# Altium PCB 0.PCB1.PcbDoc (part 7 of 10)
Units mil, origin at the board's own origin, x right, y up, seen from the top; angles counter-clockwise.
Board outline 3897.64 x 3897.64 mil, 6 copper layers (Top Layer, Layer 1, Layer 3, Layer 4, Layer 2, Bottom Layer), stack 60.567 mil thick; 715 components, 563 nets, 2530 pads, 1442 vias.
Unrouted connection lines stored in the file: 6.
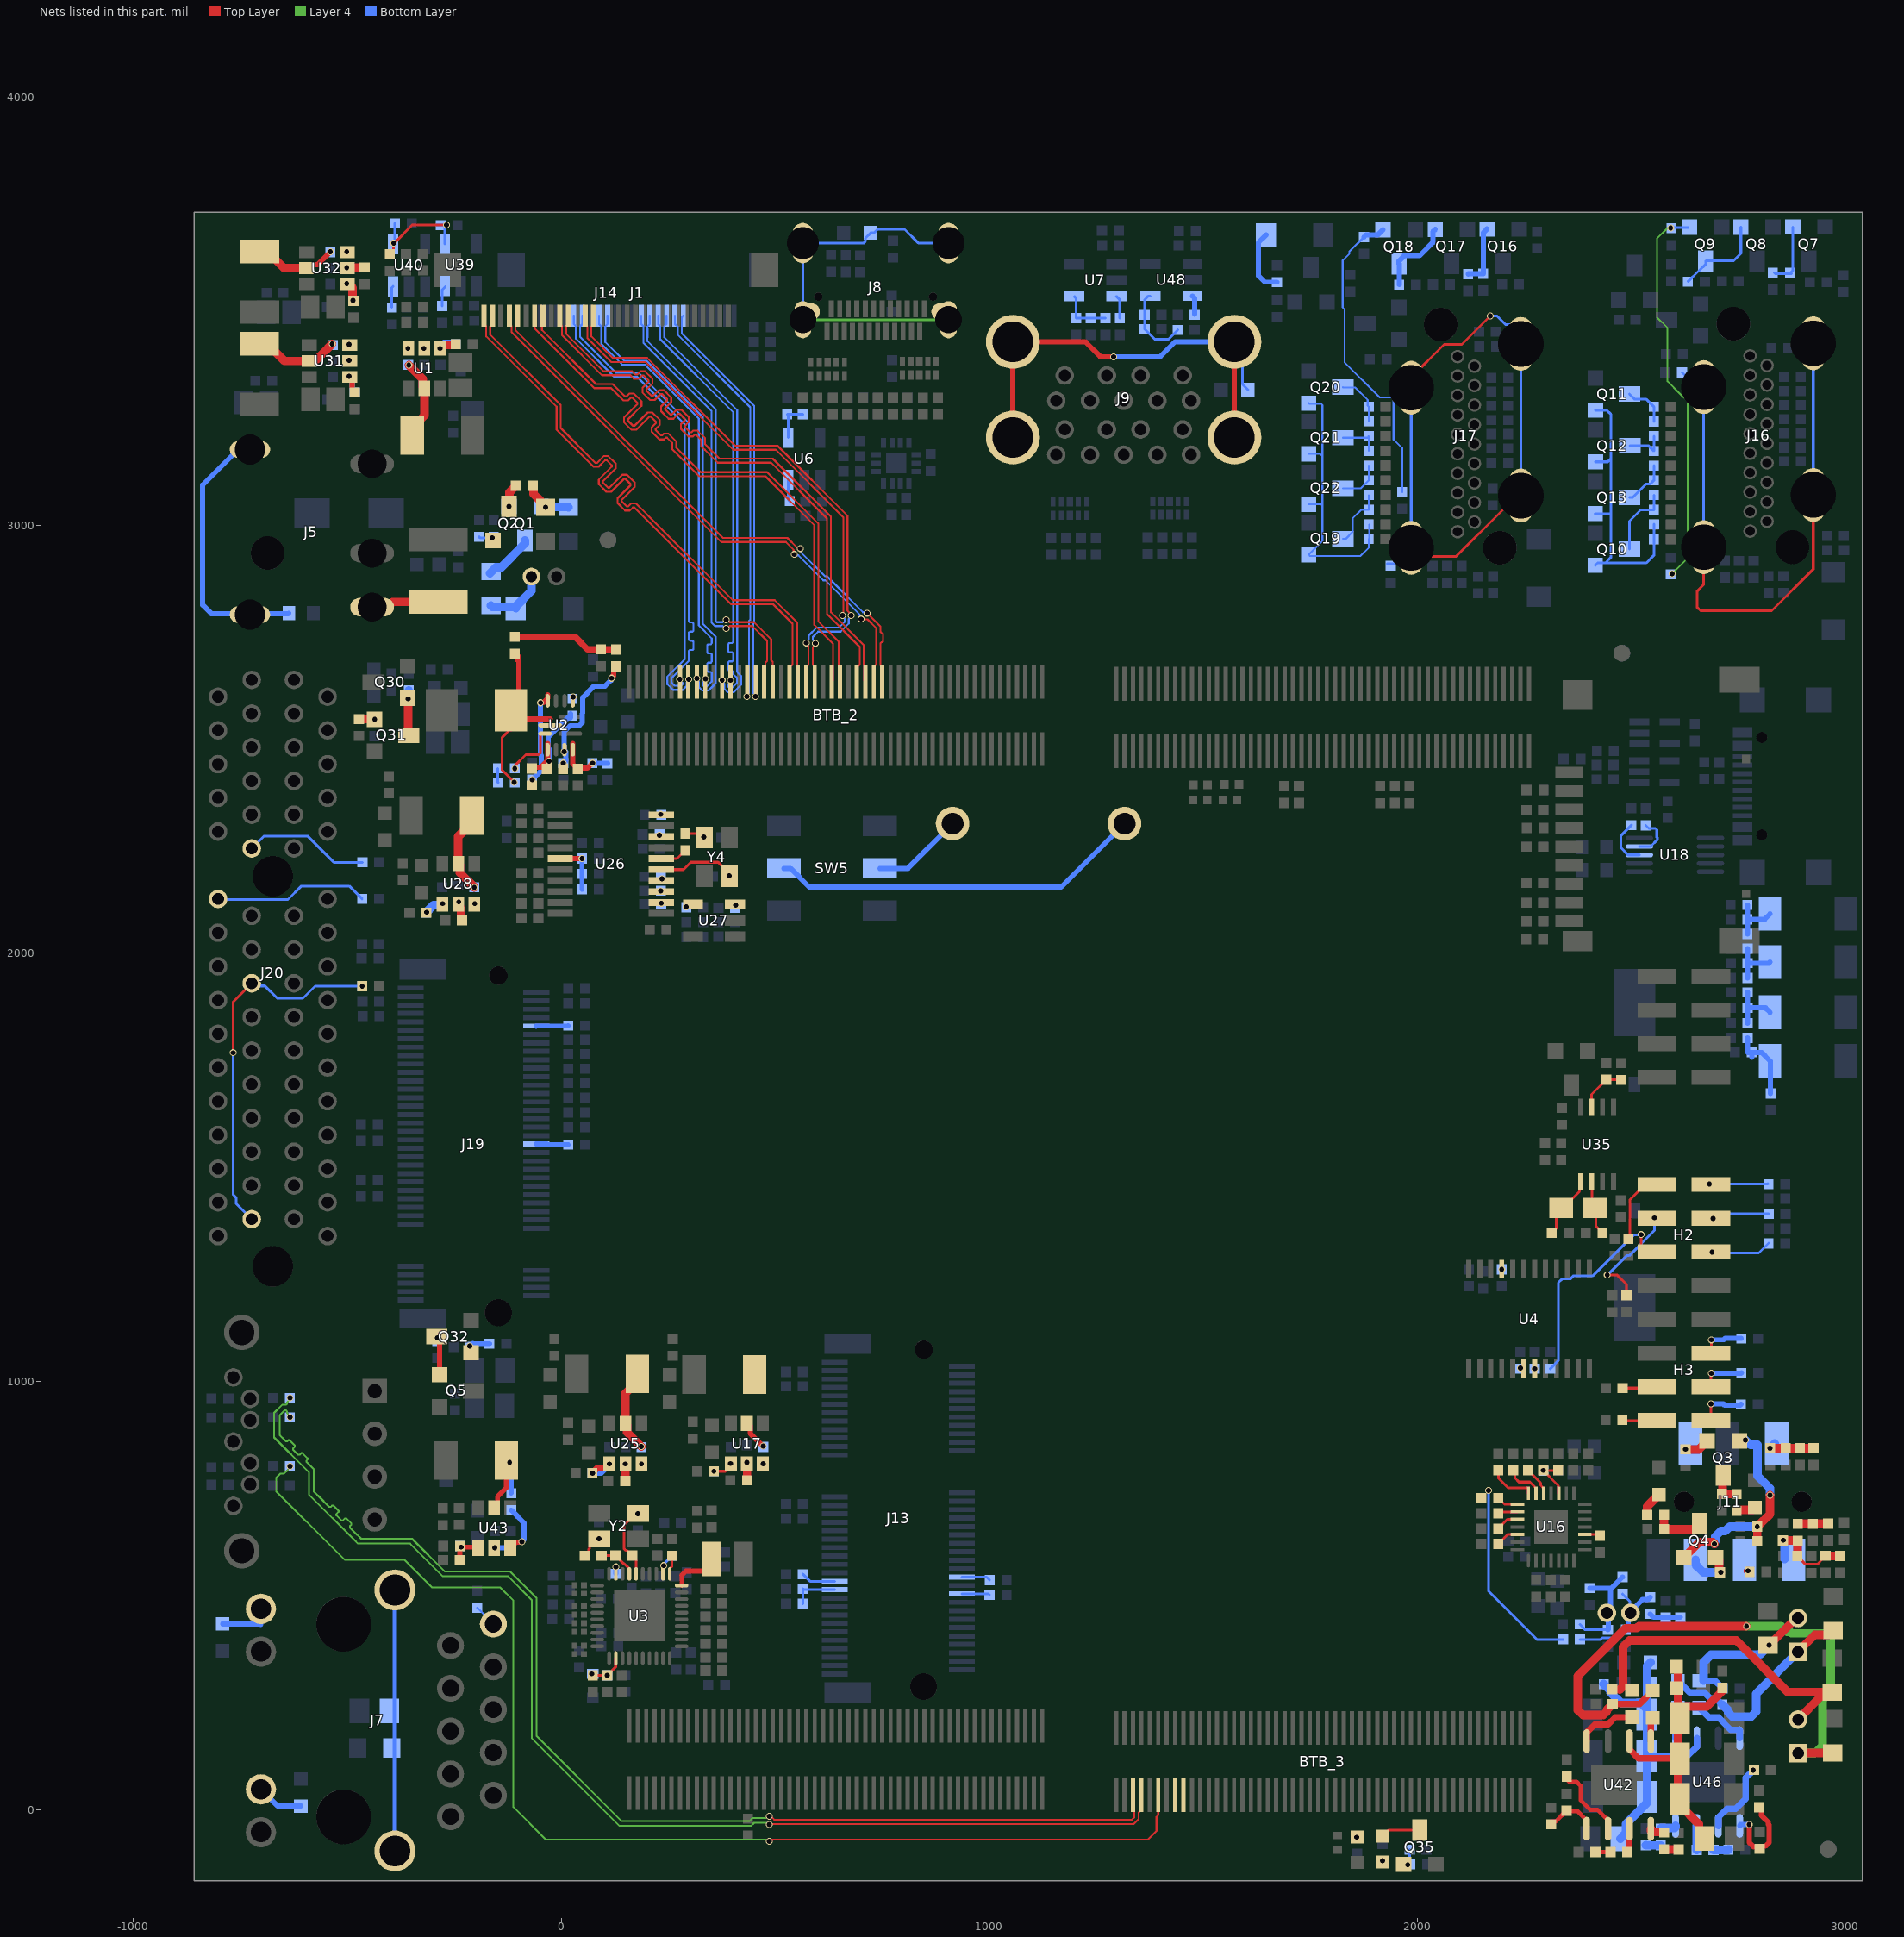
[diagram p10: the nets of this part, all layers, seen from the top]

## Via types
v1: diameter 16.14, hole 11.81, Top Layer to Bottom Layer, tented both sides, 1434 vias
v2: diameter 16.14, hole 11.81, Top Layer to Bottom Layer, 8 vias

## Nets (pads, with @x,y where several pads share a name; then routed paths per layer and width w, separated by ;. In a path a pad name is that pad's centre, name@x,y a point inside that pad or via, vN(x,y) a via of type N, cw(c..) or ccw(c..) an arc to the next point about the centre after c; other vN are vias at no path point) (continued)
MIC2P: C115.2 R130.2 | length 455.9
  Bottom Layer w6.16: v1(2166.78,745.08) 2166.78,509.85 2279.38,397.25 R130.2@2340.83,397.25
MIPI_DPHY0_RX_CLKN: BTB_2.13 J1.10 | length 1014
  Top Layer w4.42: BTB_2.13@395.71,2634.65 395.9,2634.84 v1(395.9,2637.6)
  Bottom Layer w4.42: J1.10@226.41,3489.66 226.41,3469.98 231.33,3465.05 231.33,3434.77 401.38,3264.72 401.38,2743.1 401.38,2727.25 398.79,2724.66 392.68,2724.66 390.53,2722.52 390.53,2705.38 392.68,2703.24 399.66,2703.24 401.8,2701.1 401.8,2683.96 399.66,2681.82 392.68,2681.82 390.53,2679.68 390.53,2662.54 392.68,2660.4 398.79,2660.4 401.38,2657.81 401.38,2655.6 401.38,2652.91 410.6,2643.69 410.6,2631.51 398.95,2619.86 393.44,2619.86 390.85,2622.45 390.85,2629.38 395.9,2634.43 v1(395.9,2637.6)
MIPI_DPHY0_RX_CLKP: BTB_2.12 J1.9 | length 1013.4
  Top Layer w4.42: v1(375.96,2637.86) 376.02,2637.79 BTB_2.12@376.02,2634.65
  Bottom Layer w4.42: J1.9@246.1,3489.66 246.1,3469.98 241.18,3465.05 241.18,3438.84 411.22,3268.8 411.22,2656.99 420.44,2647.77 420.44,2627.43 403.03,2610.02 389.36,2610.02 381.01,2618.38 381.01,2629.63 375.96,2634.68 v1(375.96,2637.86)
MIPI_DPHY0_RX_D0N: BTB_2.17 J1.12 | length 1035.4
  Top Layer w4.42: v1(385.9,2759.21) 389.07,2759.21 394.2,2764.35 446.65,2764.35 481.34,2729.66 481.34,2683.12 477.16,2678.94 477.16,2637.36 BTB_2.17@474.45,2634.65
  Bottom Layer w4.42: J1.12@187.04,3489.66 187.04,3469.98 192.15,3464.87 192.15,3454.55 192.48,3454.22 192.48,3442.38 192.15,3442.05 192.15,3426.15 351.32,3266.98 351.32,2772.45 359.43,2764.35 377.6,2764.35 382.73,2759.21 v1(385.9,2759.21)
MIPI_DPHY0_RX_D0P: BTB_2.18 J1.11 | length 1034
  Top Layer w4.42: v1(385.9,2778.9) 389.07,2778.9 394.2,2773.77 450.55,2773.77 490.76,2733.57 490.76,2684.58 494.13,2681.2 BTB_2.18@494.13,2634.65
  Bottom Layer w4.42: J1.11@206.73,3489.66 206.73,3469.98 201.57,3464.81 201.57,3458.45 201.9,3458.12 201.9,3438.48 201.57,3438.15 201.57,3430.06 360.74,3270.88 360.74,2776.36 363.33,2773.77 377.6,2773.77 382.73,2778.9 v1(385.9,2778.9)
MIPI_DPHY0_RX_D1N: BTB_2.15 J1.8 | length 1000.6
  Top Layer w4.42: v1(434.01,2600.1) 435.08,2601.16 BTB_2.15@435.08,2634.65
  Bottom Layer w4.42: J1.8@265.78,3489.66 265.78,3469.98 272.14,3463.62 272.14,3444.94 441.75,3275.33 441.75,2779.25 439.15,2776.65 439.15,2608.4 434.01,2603.27 v1(434.01,2600.1)
MIPI_DPHY0_RX_D1P: BTB_2.16 J1.7 | length 999.6
  Top Layer w4.42: v1(453.7,2600.1) 454.76,2601.16 BTB_2.16@454.76,2634.65
  Bottom Layer w4.42: J1.7@285.47,3489.66 281.77,3485.97 281.77,3463.91 281.56,3463.69 281.56,3448.84 451.17,3279.23 451.17,2775.35 448.57,2772.75 448.57,2608.4 453.7,2603.27 v1(453.7,2600.1)
MIPI_DPHY0_RX_D2N: BTB_2.10 J1.17 | length 1078
  Top Layer w4.42: BTB_2.10@336.65,2634.65 336.9,2634.9 v1(336.9,2640.9)
  Bottom Layer w4.42: J1.17@88.62,3489.66 88.62,3469.98 93.72,3464.87 93.72,3424.18 143.26,3374.64 196.14,3374.64 321.5,3249.28 321.5,2766.1 352,2735.6 352,2730.6 352,2724.45 349.41,2721.86 343.24,2721.86 341.1,2719.72 341.1,2702.58 343.24,2700.44 349.86,2700.44 352,2698.3 352,2681.16 349.86,2679.02 343.24,2679.02 341.1,2676.88 341.1,2659.74 343.24,2657.6 349.41,2657.6 352,2655.01 352,2652.8 352,2635.21 340.19,2623.4 333.78,2623.4 331.19,2625.98 331.19,2632.45 336.9,2638.16 v1(336.9,2640.9)
MIPI_DPHY0_RX_D2P: BTB_2.9 J1.16 | length 1078.1
  Top Layer w4.42: BTB_2.9@316.97,2634.65 317.25,2634.94 v1(317.25,2642.12)
  Bottom Layer w4.42: J1.16@108.3,3489.66 108.3,3469.98 103.14,3464.81 103.14,3428.08 147.16,3384.06 200.04,3384.06 330.92,3253.18 330.92,2770 361.42,2739.5 361.42,2631.31 344.09,2613.98 329.88,2613.98 321.77,2622.08 321.77,2634.43 317.25,2638.94 v1(317.25,2642.12)
MIPI_DPHY0_RX_D3N: BTB_2.8 J1.20 | length 1089.1
  Top Layer w4.42: BTB_2.8@297.4,2640.23 v1(297.64,2640.47)
  Bottom Layer w4.42: J1.20@29.56,3489.66 29.56,3469.98 34.72,3464.81 34.72,3436.18 123.76,3347.14 177.04,3347.14 289.1,3235.08 289.1,2687.43 248.18,2646.51 248.18,2628.6 261.23,2615.55 284.37,2615.55 292.81,2623.99 292.81,2632.48 297.64,2637.3 v1(297.64,2640.47)
MIPI_DPHY0_RX_D3P: BTB_2.7 J1.19 | length 1095.1
  Top Layer w4.42: v1(277.24,2640.01) 277.24,2635.01 BTB_2.7@277.6,2634.65
  Bottom Layer w4.42: J1.19@49.25,3489.66 49.25,3469.98 44.14,3464.87 44.14,3440.08 127.66,3356.56 180.94,3356.56 298.52,3238.98 298.52,2790.81 298.52,2775.47 301.11,2772.88 306.91,2772.88 309.05,2770.74 309.05,2753.6 306.91,2751.46 300.66,2751.46 298.52,2749.32 298.52,2732.18 300.66,2730.04 306.91,2730.04 309.05,2727.9 309.05,2710.76 306.91,2708.62 301.11,2708.62 298.52,2706.03 298.52,2683.53 297.39,2682.4 257.6,2642.61 257.6,2632.5 265.13,2624.97 280.47,2624.97 283.39,2627.89 283.39,2631.56 279.2,2635.75 v1@279.2,2641.3
MIPI_DPHY0_TX_CLKN: BTB_2.25 J14.24 | length 1400
  Top Layer w4.42: J14.24@-62.04,3489.52 J14.24@-62.04,3489.52 -62,3459.89 -51.44,3449.34 -51.44,3449.26 77.63,3320.19 116.69,3320.19 138.94,3297.94 145.21,3291.67 156.68,3291.67 163.04,3298.03 166.07,3298.03 178.18,3285.91 178.18,3282.88 146.68,3251.37 146.68,3240.54 164.31,3222.91 175.15,3222.91 206.19,3253.95 209.22,3253.95 221.34,3241.83 221.34,3238.8 211.66,3229.12 211.66,3218.29 229.29,3200.66 240.12,3200.66 243.91,3204.44 246.94,3204.44 259.05,3192.32 259.05,3189.29 259.05,3177.83 286.74,3150.14 322.39,3114.49 477.21,3114.49 591.34,3000.36 591.34,2767.26 635.4,2723.2 635.4,2674.4 634.64,2673.64 634.64,2637.36 BTB_2.25@631.93,2634.65
MIPI_DPHY0_TX_CLKP: BTB_2.26 J14.23 | length 1399
  Top Layer w4.42: J14.23@-42.35,3489.52 -44.78,3487.09 -44.78,3456.08 81.58,3329.72 116.85,3329.72 116.96,3329.61 120.59,3329.61 145.6,3304.6 149.11,3301.09 152.78,3301.09 159.14,3307.45 169.97,3307.45 187.6,3289.81 187.6,3278.98 156.1,3247.47 156.1,3244.44 168.21,3232.33 171.24,3232.33 202.29,3263.37 213.12,3263.37 230.76,3245.73 230.76,3234.9 221.08,3225.22 221.08,3222.19 233.19,3210.08 236.22,3210.08 240,3213.86 250.84,3213.86 268.47,3196.22 268.47,3185.39 268.47,3181.73 293.4,3156.8 326.29,3123.91 481.11,3123.91 600.76,3004.26 600.76,2775.86 648.14,2728.47 648.14,2674.4 648.9,2673.64 648.9,2637.36 BTB_2.26@651.61,2634.65
MIPI_DPHY0_TX_D0N: BTB_2.30 J14.27 | length 1316.6
  Top Layer w4.42: J14.27@-121.09,3489.52 -121.09,3469.84 -115.96,3464.71 -115.96,3451.06 374.22,2960.88 524.8,2960.88 543.21,2942.47 543.21,2933.39 v1(544.9,2931.7) ; v1(700.4,2780.7) 700.77,2780.33 715.64,2780.33 736.5,2759.47 736.5,2675.25 730.35,2669.1 BTB_2.30@730.35,2634.65
  Bottom Layer w4.42: v1(544.9,2931.7) 547.14,2929.46 554.38,2929.46 612.55,2871.29 617.42,2871.29 698.23,2790.48 698.23,2782.87 v1(700.4,2780.7)
MIPI_DPHY0_TX_D0P: BTB_2.31 J14.26 | length 1317.1
  Top Layer w4.42: J14.26@-101.41,3489.52 -101.41,3469.84 -106.54,3464.71 -106.54,3454.96 378.12,2970.3 528.7,2970.3 551.12,2947.88 556.77,2947.88 v1(559.02,2945.64) ; v1(714.68,2794.61) 745.92,2763.37 745.92,2753 745.92,2750.79 748.51,2748.2 749.9,2748.2 752.04,2746.06 752.04,2728.92 749.9,2726.78 748.51,2726.78 745.92,2724.19 745.92,2699.1 745.92,2673.22 750.04,2669.1 BTB_2.31@750.04,2634.65
  Bottom Layer w4.42: v1(559.02,2945.64) 561.24,2943.41 561.24,2935.91 616.45,2880.71 621.32,2880.71 705.18,2796.85 712.44,2796.85 v1(714.68,2794.61)
MIPI_DPHY0_TX_D1N: BTB_2.28 J14.21 | length 1400
  Top Layer w4.42: J14.21@-2.98,3489.52 -2.98,3469.84 2.18,3464.67 2.18,3443.53 95.32,3350.4 161.58,3350.4 163.35,3348.63 169.62,3342.35 181.09,3342.35 189,3350.27 192.03,3350.27 204.15,3338.15 204.15,3335.12 189.97,3320.95 189.97,3310.11 207.61,3292.48 218.44,3292.48 232.62,3306.65 235.65,3306.65 247.76,3294.54 247.76,3291.51 233.59,3277.33 233.59,3266.5 251.22,3248.86 262.06,3248.86 273.81,3260.62 276.84,3260.62 288.96,3248.5 288.96,3245.47 279.68,3236.2 279.68,3225.36 297.32,3207.73 308.15,3207.73 311.93,3211.51 314.96,3211.51 327.08,3199.4 327.08,3196.37 327.08,3184.9 335.74,3176.24 365.78,3146.2 490.5,3146.2 621,3015.7 621,2792.59 697.8,2715.79 697.8,2674.4 695.21,2671.81 693.7,2671.81 690.98,2669.1 BTB_2.28@690.98,2634.65
MIPI_DPHY0_TX_D1P: BTB_2.29 J14.20 | length 1397.7
  Top Layer w4.42: J14.20@16.7,3489.52 16.7,3469.84 11.6,3464.74 11.6,3447.44 99.22,3359.82 165.48,3359.82 170.01,3355.29 173.53,3351.77 177.19,3351.77 185.1,3359.69 195.93,3359.69 213.57,3342.05 213.57,3331.22 199.39,3317.05 199.39,3314.02 211.51,3301.9 214.54,3301.9 228.72,3316.07 239.55,3316.07 257.18,3298.44 257.18,3287.61 243.01,3273.43 243.01,3270.4 255.13,3258.28 258.16,3258.28 269.91,3270.04 280.74,3270.04 298.38,3252.41 298.38,3241.57 289.1,3232.3 289.1,3229.27 301.22,3217.15 304.25,3217.15 308.03,3220.93 318.86,3220.93 336.5,3203.3 336.5,3192.46 336.5,3188.8 342.4,3182.9 369.68,3155.62 494.4,3155.62 630.42,3019.6 630.42,2796.49 707.22,2719.69 707.22,2674.4 707.96,2673.66 707.96,2637.36 BTB_2.29@710.67,2634.65
MIPI_DPHY0_TX_D2N: BTB_2.22 J14.18 | length 1282.4
  Top Layer w4.42: J14.18@56.07,3489.52 56.07,3469.84 61.21,3464.7 61.21,3436.97 116.7,3381.48 196.9,3381.48 402.08,3176.3 501.6,3176.3 659.55,3018.35 659.55,2791.43 v1(657.61,2789.5) ; BTB_2.22@572.87,2634.65 572.87,2669.1 577.67,2673.89 577.67,2684.84 578.12,2685.29 578.12,2716.78 572.87,2722.03 v1(572.87,2725.2)
  Bottom Layer w4.42: v1@576.4,2727.5 575.38,2728.52 575.38,2730.35 578.68,2733.65 578.68,2742.73 596.73,2760.77 649.08,2760.77 662.75,2774.44 662.75,2781.19 657.61,2786.33 v1(657.61,2789.5)
MIPI_DPHY0_TX_D2P: BTB_2.23 J14.17 | length 1288.1
  Top Layer w4.42: J14.17@75.76,3489.52 75.76,3469.84 70.63,3464.7 70.63,3440.87 120.6,3390.9 200.8,3390.9 405.98,3185.72 505.5,3185.72 668.97,3022.26 668.97,2800.23 677.3,2791.9 v1(677.3,2789.5) ; BTB_2.23@592.56,2634.65 592.56,2669.1 587.77,2673.89 587.77,2715.22 593.91,2721.37 v1(593.91,2724.12)
  Bottom Layer w4.42: v1(593.91,2724.12) 593.91,2726.77 588.1,2732.57 588.1,2738.83 600.63,2751.35 652.98,2751.35 672.17,2770.54 672.17,2781.19 677.3,2786.33 v1(677.3,2789.5)
MIPI_DPHY0_TX_D3N: BTB_2.20 J14.30 | length 1396.3
  Top Layer w4.42: J14.30@-180.15,3489.52 -180.15,3469.84 -174.98,3464.67 -174.98,3441.28 -10.6,3276.9 -10.6,3223.1 69.85,3142.65 73.36,3139.14 76.12,3136.38 87.59,3136.38 103.26,3152.05 106.29,3152.05 118.41,3139.93 118.41,3136.9 88.1,3106.59 88.1,3095.76 105.73,3078.13 116.56,3078.13 146.88,3108.44 149.9,3108.44 162.02,3096.32 162.02,3093.29 131.71,3062.98 131.71,3052.15 149.35,3034.51 160.18,3034.51 167.25,3041.59 170.91,3041.59 193.09,3019.41 196.6,3015.9 397.12,2815.38 495.12,2815.38 540.6,2769.9 540.6,2674.4 538.01,2671.81 536.22,2671.81 533.5,2669.1 BTB_2.20@533.5,2634.65
MIPI_DPHY0_TX_D3P: BTB_2.21 J14.29 | length 1432.6
  Top Layer w4.42: J14.29@-160.45,3489.52 -160.45,3469.84 -165.56,3464.73 -165.56,3445.19 -1.18,3280.8 -1.18,3227 76.51,3149.31 80.02,3145.8 83.69,3145.8 99.36,3161.47 110.19,3161.47 127.83,3143.84 127.83,3133 97.52,3102.69 97.52,3099.66 109.63,3087.54 112.66,3087.54 142.97,3117.86 153.81,3117.86 171.44,3100.22 171.44,3089.39 141.13,3059.08 141.13,3056.05 153.25,3043.93 156.28,3043.93 163.35,3051.01 174.82,3051.01 199.75,3026.07 203.26,3022.56 401.02,2824.8 499.02,2824.8 551.5,2772.32 551.5,2636.34 BTB_2.21@553.19,2634.65 ; BTB_2.21@550.48,2637.36 BTB_2.21@550.48,2673.78 ; BTB_2.21@551.3,2663.6 BTB_2.21@553.19,2665.49
NetC4_1: C4.1 D2.2 R1.1 SW1.2 | length 182.3
  Bottom Layer w12: D2.2@2772,1802.5 2772.15,1802.35 2772.15,1768.75 2772.3,1768.6 R1.1@2781.58,1768.6 ; 2781.58,1757 R1.1@2781.58,1768.6 ; C4.1@2825.4,1672.78 2825.4,1747.73 SW1.2@2824.23,1748.9 2804.53,1768.6 R1.1@2781.58,1768.6
NetC5_1: C5.1 D3.2 R2.1 SW2.2 | length 128.8
  Bottom Layer w12: R2.1@2771.98,1836.6 D3.2@2771.98,1872.7 ; C5.1@2771.98,1908.8 D3.2@2771.98,1872.7 ; SW2.2@2824.23,1862.3 2813.83,1872.7 D3.2@2771.98,1872.7
NetC6_1: C6.1 U1.6
  other v1: -358.1,3413.07
NetC6_2: C6.2 L2.1 U1.2 | length 191.3
  Top Layer w20: v1(-355.9,3374.12) -323.38,3341.6 -323.38,3323.56 U1.2@-319.6,3319.78 -319.6,3256.14 -348.3,3227.44 L2.1@-348.3,3209.72
NetC7_1: C7.1 R4.1 R7.1 U1.4 | length 82.9
  Top Layer w20: v1(-283.3,3413.07) -283.3,3416.55 -278.42,3421.42 -248.06,3421.42 R4.1@-246.26,3423.22
  Bottom Layer w20: R7.1@-282.2,3414.27 -273.24,3423.22 C7.1@-246.26,3423.22
NetC14_1: C14.1 U32.6
  other v1: -501.07,3639.18
NetC14_2: C14.2 L21.1 U32.2 | length 195.7
  Top Layer w12: U32.2@-592.5,3600.8 -584.84,3608.46 -569.44,3608.46 v1(-539.2,3638.7)
  Top Layer w20: L21.1@-704.31,3639.67 -686.59,3639.67 -647.6,3600.68 U32.2@-594.35,3600.68
  Bottom Layer w12: C14.2@-539.23,3638.08 v1(-539.2,3638.7)
NetC15_1: C15.1 D4.2 R5.1 SW3.2 | length 122.1
  Bottom Layer w12: C15.1@2771.68,1942.4 2771.78,1942.5 R5.1@2771.78,1977 ; D4.2@2771.88,2010.9 2771.78,2010.8 R5.1@2771.78,1977 ; SW3.2@2824.23,1979.5 2821.73,1977 R5.1@2771.78,1977
NetC16_1: C16.1 R8.2 | length 33.1
  Bottom Layer w6.16: R8.2@-147.67,2432.09 -147.67,2399.29 C16.1@-147.47,2399.09
NetC16_2: C16.2 L3.1 R10.1 U2.7 | length 402.3
  Top Layer w6.16: L3.1@-117.99,2524.29 -137.79,2504.49 -137.79,2427.79 v1(-109.59,2399.59)
  Top Layer w12: L3.1@-117.99,2524.29 L3.1@-95.19,2547.09 ; L3.1@-117.3,2567.4 L3.1@-117.3,2579.21 ; R10.1@-109.5,2703.3 -102.8,2696.6 -102.8,2685.9 -98.8,2681.9 ; R10.1@-100,2693.8 -98.8,2692.6 -98.8,2681.9 ; L3.1@-97.1,2602.2 -98.8,2603.9 -98.8,2681.9 ; L3.1@-86.59,2567.4 -86.59,2555.69 L3.1@-95.19,2547.09 ; -25.71,2547.09 L3.1@-95.19,2547.09
  Bottom Layer w6.16: v1(-109.59,2399.59) -109.09,2399.09 C16.2@-108.11,2399.09
NetC20_1: C20.1 R10.2 R13.2 | length 246.9
  Top Layer w15: R10.2@-104.5,2741.6 -104.5,2738.9 -104.3,2738.7 -27.4,2738.7 -27.1,2739 32.3,2739 61.32,2709.98 C20.1@92.6,2709.98 ; C20.1@93.5,2709.1 94.23,2709.83 127.85,2709.83 R13.2@128,2709.68
NetC25_1: C25.1 R14.1 R15.1 U2.9 | length 225.2
  Top Layer w12: R14.1@-68.16,2431.2 -64.41,2434.95 -46.93,2434.95 -34.79,2447.09 -34.3,2447.09 -33.51,2447.87 -28.71,2447.87 v1(-27.92,2448.67) ; v1@-31.62,2449.77 U2.9@-31.65,2475.7 U2.9@-31.62,2490
  Bottom Layer w12: v1(-27.92,2448.67) -27.92,2477.54 -30,2479.62 -30,2505.15 14.17,2549.32 21,2549.32 22.27,2550.59 R15.1@22.27,2559.65
NetC26_1: C26.1 R9.2 R16.1 U2.12 | length 137.8
  Top Layer w12: U2.12@27.44,2490 27.44,2441.89 36.52,2432.8 61.56,2432.8 v1(73.11,2444.35)
  Bottom Layer w12: v1(73.11,2444.35) 73.4,2444.06 108.02,2444.06 R16.1@108.31,2443.77
NetC28_1: C28.1 D6.2 R19.1 SW4.2 | length 125.9
  Bottom Layer w12: C28.1@2771.48,2113.03 2771.53,2112.98 R19.1@2771.53,2079.5 ; D6.2@2771.58,2045.1 D6.2@2771.58,2045.1 R19.1@2771.53,2079.5 ; SW4.2@2824.23,2092.1 2811.63,2079.5 R19.1@2771.53,2079.5
NetC54_1: C54.1 R387.1 Y2.1 | length 56.8
  Top Layer w6.16: R387.1@55.22,592.71 63.94,601.43 63.94,607.41 66.2,609.67 66.2,615.57 82.8,632.18 v1(88.71,632.18)
NetC55_1: C55.1 R386.2 U3.36 Y2.3 | length 171.2
  Top Layer w6.16: U3.36@175.02,550.54 175.02,584.1 153.7,605.41 150.74,605.41 146.59,609.56 146.59,663.74 156.75,673.9 156.75,674.63 173.35,691.24 v1(179.26,691.24)
NetC56_1: C56.1 J7.1 | length 53
  Bottom Layer w5.15: C56.1@-195.9,471.22 -160.1,435.42 J7.1@-160.1,433
NetC57_1: C57.1 J7.15 J7.16 R71.1 | length 609.8
  Bottom Layer w10: J7.16@-388.42,-133.22 J7.15@-388.42,476.62
NetC58_1: C58.1 D7.2 R69.2 R70.2 U3.12 | length 86.2
  Top Layer w6.16: v1(71.72,316.79) 75.23,313.28 v1(107.86,313.28) 127.29,332.71 127.29,353.2 U3.12@127.77,353.68
NetC86_1: C86.1 R93.2 U6.4 | length 92
  Bottom Layer w6.16: U6.4@530.6,3204.81 530.6,3256.93 C86.1@528.12,3259.4 563.82,3259.4 R93.2@564.3,3258.92
NetC89_1: C89.1 R33.2 R96.2 U7.4 | length 120.4
  Bottom Layer w6.16: U7.4@1198.79,3534.63 1203.4,3530.02 C89.1@1203.4,3484.11 R96.2@1237.43,3484.11 R33.2@1271.4,3484.11
NetC106_1: C106.1 C107.1 R112.1 U16.17 | length 103.3
  Top Layer w6.16: C106.1@2329.41,791.95 v1(2294.41,791.95) 2329.83,756.53 2329.83,739.52 U16.17@2330.69,738.66
NetC111_1: C111.1 R113.1 R115.1 | length 68.3
  Top Layer w20: R115.1@2889.01,667.4 R113.1@2924.31,667.4 2955.93,667.4 C111.1@2956.91,666.42
NetC112_1: C112.1 U16.24 | length 53.8
  Top Layer w6.16: C112.1@2189.31,656.21 2210.73,677.64 U16.24@2234.23,677.64
NetC113_1: C113.1 U16.23 | length 46.3
  Top Layer w6.16: C113.1@2189.31,691.98 2192.68,695.35 U16.23@2234.23,695.35
NetC115_1: C115.1 U16.22 | length 51
  Top Layer w6.16: C115.1@2189.31,727.75 2203.99,713.07 U16.22@2234.23,713.07
NetC116_1: C116.1 D82.2 J11.1 R114.1 R115.2 R116.1 | length 234.2
  Top Layer w6.16: R116.1@2888.51,592.6 2888.51,591.6 2901.93,578.18 2901.93,577.35 2906.07,573.2 2935.54,573.2 2939.89,577.56 2939.89,578.29 C116.1@2954.11,592.5
  Top Layer w20: D82.2@2854.41,628.62 2854.7,628.33 2889.22,628.33 2888.51,627.62 R116.1@2888.51,592.6 ; D82.2@2855.67,628.33 v1(2855.67,628.92) ; C116.1@2954.11,592.5 2954.26,592.35 2988.06,592.35 R114.1@2988.21,592.2
  Bottom Layer w20: v1(2855.67,628.92) 2858.54,626.05 J11.1@2858.54,584.77
NetC117_1: C117.1 U16.21 | length 109.5
  Top Layer w6.16: C117.1@2189.41,791.95 2189.41,774.63 2212.71,751.33 2258.96,751.33 2259.82,750.47 U16.21@2259.82,738.66
NetC118_1: C118.1 U16.20 | length 90.3
  Top Layer w6.16: C118.1@2224.41,791.95 2228.13,788.23 2228.13,774.52 2237.7,764.95 2263.23,764.95 2270.84,757.34 2270.84,757.17 2277.54,750.47 U16.20@2277.54,738.66
NetC119_1: C119.1 U16.19 | length 68.1
  Top Layer w6.16: C119.1@2259.41,791.95 2288.56,762.8 2288.56,757.16 2295.25,750.47 U16.19@2295.25,738.66
NetC120_1: C120.1 U16.10 | length 36.5
  Top Layer w6.16: U16.10@2391.71,642.2 2424.56,642.2 C120.1@2427.11,639.65
NetC122_2: C122.2 R122.2 | length 46.1
  Top Layer w20: R122.2@2746.11,697.44 2748.54,699.87 2783.06,699.87 C122.2@2788.81,705.62
NetC125_1: C125.1 R125.2 R126.1 | length 73.7
  Bottom Layer w12: R126.1@2544.35,456.54 2551.92,448.97 C125.1@2614.87,448.97
NetC126_1: C126.1 D83.2 P1.1 R126.2 R130.1 | length 265.9
  Bottom Layer w6.16: R130.1@2380.19,397.25 2428.82,397.25 2432.45,400.88 2468.26,400.88 D83.2@2487.61,420.23 ; C126.1@2479.61,503.52 2497.04,486.09 2497.04,460.33 P1.1@2498.17,459.2
  Bottom Layer w12: D83.2@2487.61,420.23 2492.89,425.51 2492.89,453.92 P1.1@2498.17,459.2 ; P1.1@2502.67,467 2503,467 2526.1,490.1 2538.55,490.1 R126.2@2544.35,495.9
NetC126_2: C126.2 D78.2 P1.2 R134.1 R136.1 | length 259.8
  Bottom Layer w6.16: R134.1@2379.99,432.35 2392.58,419.76 D78.2@2445.58,419.76
  Bottom Layer w12: R136.1@2403.05,517 2403.15,517.1 2454.79,517.1 ; D78.2@2445.58,419.76 2446.57,420.74 2446.57,466.02 2451.22,470.67 2451.22,513.53 2454.79,517.1 ; C126.2@2479.61,542.88 2454.79,518.07 2454.79,517.1
NetC127_1: C127.1 U17.6
  other v1: 472.01,807.81
NetC127_2: C127.2 L25.1 U17.2 | length 66.6
  Top Layer w12: U17.2@438.4,899.8 441.68,896.52 441.68,879.02 v1(471.9,848.8)
  Bottom Layer w12: v1(471.9,848.8) 472.01,848.69 C127.2@472.01,847.17
NetC128_1: C128.1 R138.1 R141.1 U17.4 | length 49.7
  Top Layer w6.16: v1(356.77,790.05) 383.38,790.05 395.46,802.12 v1(395.46,808.15)
NetC142_1: C142.1 Q7.1 R153.2 | length 146.7
  Bottom Layer w6.16: R153.2@2834.2,3589.89 2836.38,3587.71 C142.1@2874.1,3587.71 ; C142.1@2874.9,3592.11 2877.7,3594.91 Q7.1@2877.7,3696.81
NetC154_1: C154.1 Q16.1 R174.2 | length 143.6
  Bottom Layer w12: C154.1@2119,3586.82 2119.4,3587.22 2153.9,3587.22 R174.2@2154.3,3587.62 2154.3,3683.14 Q16.1@2163.1,3691.94
NetC156_1: C156.1 U25.6
  other v1: 187.6,807.16
NetC156_2: C156.2 L16.1 U25.2 | length 196.7
  Top Layer w20: L16.1@178,1017.6 178,999.88 150.2,972.08 U25.2@150.2,901.64 153.98,897.86 153.98,881.22 v1(187.4,847.8)
NetC157_1: C157.1 R218.1 R227.1 U25.4 | length 99.4
  Top Layer w15: v1(73.1,785.8) 84.24,796.94 106.52,796.94 112.8,803.22 v1(112.8,807.16)
  Bottom Layer w15: v1(73.1,785.8) 74.44,787.14 92.78,787.14 v1(112.8,807.16)
NetC164_1: C164.1 U26.5 Y4.1 | length 182
  Top Layer w6.16: U26.5@234.03,2195.61 271.13,2195.61 271.2,2195.68 285.93,2195.68 302.97,2212.73 366.74,2212.73 392.31,2187.16 v1(392.31,2181.16)
NetC165_1: C165.1 R230.1 Y4.3 | length 46.5
  Top Layer w6.16: R230.1@290.18,2279.93 325.03,2279.93 v1(333.25,2271.71)
NetC166_1: C166.1 C167.1 R235.2 U26.15 | length 122.9
  Top Layer w12: U26.15@-2.19,2221.2 48.4,2221.2 v1(48.7,2221.5)
  Bottom Layer w12: C167.1@48.7,2149.63 C166.1@48.7,2185.57 v1(48.7,2221.5)
NetC179_1: C179.1 U28.6
  other v1: -201.88,2116.06
NetC179_2: C179.2 L17.1 U28.2 | length 196.8
  Top Layer w20: L17.1@-208.81,2322.4 -208.81,2304.68 -240.38,2273.11 U28.2@-240.38,2209.34 -236.6,2205.56 -236.6,2187.84 v1(-202.98,2154.22)
NetC188_1: C188.1 U27.4
  other v1: 292.38,2108.23
NetC194_1: C194.1 R249.1 R250.1 U28.4 | length 47.8
  Bottom Layer w20: C194.1@-315.78,2095.1 -297.82,2113.06 -279.58,2113.06 R250.1@-277.78,2114.86 -276.68,2115.96 v1(-276.68,2116.06)
  other v1: -314.1,2096
NetC210_1: C210.1 C211.1 C218.1 C219.1 C278.1 R341.2 R342.2 U42.6 | length 711.7
  Top Layer w15: U42.6@2495.91,159.81 2495.91,140.33 2516.79,119.45 2608.51,119.45 C211.1@2609.61,118.35
  Top Layer w20: R341.2@2605.51,333.55 2609.61,329.45 2609.61,118.35 2609.61,27.95 C210.1@2613.71,23.85 2613.71,10.07 2658.23,-34.46 2658.23,-55.12 C219.1@2671.07,-67.95 ; C218.1@2613.71,213.45 2613.71,227.23 2627.33,240.85 2677.11,240.85 2711.21,274.95 2711.21,282.15 C278.1@2713.01,283.95
NetC224_1: C224.1 U31.6
  other v1: -495.45,3422.3
NetC224_2: C224.2 L20.1 U31.2 | length 202.5
  Top Layer w20: L20.1@-704.59,3423.87 -686.88,3423.87 -646.81,3383.8 U31.2@-588.74,3383.8 -584.96,3387.58 -571.06,3387.58 -557.02,3401.63 ; -557.02,3401.67 v1(-535.19,3423.5)
NetC225_1: C225.1 R36.1 R271.1 U31.4 | length 72.8
  Top Layer w12: U31.4@-487.99,3340.14 -487.99,3315.9 C225.1@-482.19,3310.1
  Bottom Layer w12: v1(-495.35,3348.31) -488.69,3341.65 -488.69,3316.6 -485.69,3313.6 R36.1@-484,3313.6
NetC232_1: C232.1 R272.1 R274.1 U32.4 | length 47.3
  Top Layer w20: v1(-501.07,3564.37) -497.03,3564.37 -487.01,3554.35 -487.01,3526.09 v1(-486.41,3525.49)
NetC239_1: C239.1 R273.1 U32.5 | length 42.3
  Top Layer w20: v1(-501.07,3601.78) -500.82,3601.53 -460.06,3601.53 C239.1@-459.21,3602.38
NetC240_1: C240.1 U35.1 Y5.1 | length 157.3
  Top Layer w6.16: C240.1@2314.42,1346.6 2325.3,1357.48 2325.3,1393.9 Y5.1@2336.5,1405.1 2340.44,1405.1 2379.09,1443.75 2379.09,1469.29 U35.1@2383,1473.2
NetC241_1: C241.1 U35.2 Y5.2 | length 135.9
  Top Layer w6.16: U35.2@2405.2,1469 2407.9,1466.3 2407.9,1412.5 Y5.2@2415.3,1405.1 ; Y5.2@2417.8,1408.6 2417.8,1362.58 C241.1@2433.18,1347.2
NetC259_1: C259.1 C262.1 R306.2 U39.4 U40.4 | length 268
  Top Layer w6.16: R306.2@-400.5,3633.58 -391.78,3642.3 -391.78,3659.04 v1(-391.35,3659.46) ; v1@-390.55,3658.66 -347.52,3701.7 v1(-268.1,3701.7)
  Bottom Layer w6.16: U40.4@-392.8,3656.41 U40.4@-390.55,3658.66 ; v1(-391.35,3659.46) U40.4@-390.55,3658.66 ; C262.1@-388.3,3705.2 -388.3,3660.91 U40.4@-390.55,3658.66 ; U39.4@-272.14,3657.1 -272.14,3697.66 v1(-268.1,3701.7)
NetC279_2: C279.2 R343.1 | length 34.2
  Top Layer w20: R343.1@2576.71,-93.13 2576.91,-93.33 2610.51,-93.33 C279.2@2610.71,-93.53
NetC283_1: C283.1 U43.6 | length 123.7
  Top Layer w12: U43.6@-119.02,610.32 -119.02,614.26 -111.24,622.04 -107.3,622.04 -104.47,624.88 -92.71,624.88 v1(-91.92,625.67)
  Bottom Layer w12: C283.1@-116.52,699.49 -101.48,684.45 -101.48,683.88 -87.12,669.52 -87.12,630.47 v1(-91.92,625.67)
NetC283_2: C283.2 L26.1 U43.2 | length 191.3
  Top Layer w12: U43.2@-156.42,704.81 -148.64,712.59 -148.64,731.3 -127.95,751.99 L26.1@-127.95,810.77
  Bottom Layer w12: v1(-120.52,810.77) -120.52,809.65 -116.52,805.65 C283.2@-116.52,738.85
NetC284_1: C284.1 R34.2 R324.2 U48.4 | length 182.3
  Bottom Layer w6.16: U48.4@1376.59,3535.53 1372.04,3535.53 1363.32,3526.81 R324.2@1363.32,3457.96 1387.25,3434.03 1418.42,3434.03 C284.1@1440.72,3456.33
NetC287_2: C287.2 R124.2 | length 58.6
  Top Layer w20: R124.2@2537.35,688.42 2537.56,688.63 2537.56,708.37 C287.2@2564.81,735.62
NetC288_1: C288.1 D81.2 J11.6 R119.2 R120.1 | length 116.8
  Top Layer w20: v1(2824.41,844) R119.2@2860.91,844 C288.1@2894.11,844 R120.1@2926.01,844
  Bottom Layer w20: v1(2824.41,844) J11.6@2835.16,854.75
NetC289_1: C289.1 Q3.1 Q4.1 R326.1 | length 497.8
  Top Layer w20: Q4.1@2622.51,588.22 2658.79,624.5 2690.34,624.5 v1(2694.63,620.22) ; R326.1@2794.39,626.52 2794.49,626.62 v1(2794.49,660.72) C289.1@2794.59,660.82 2809.64,675.87 2810.35,675.87 2824.01,689.52 v1(2824.01,734.32)
  Bottom Layer w20: v1(2694.63,620.22) 2694.63,624.5 2696.23,626.11 2696.23,637.56 2709.16,650.49 2719.88,650.49 2730.11,660.72 v1(2794.49,660.72) ; v1(2766.84,863.3) 2778.32,851.82 2795.21,851.82 2795.21,779.42 2824.01,750.62 v1(2824.01,734.32)
NetC290_1: C290.1 R316.1 R322.1 U43.4 | length 78.1
  Top Layer w12: R322.1@-236.72,582.07 -236.43,582.36 -236.43,615.18 C290.1@-236.14,615.47 v1(-233.57,612.9) -196.39,612.9 U43.4@-193.82,610.32
NetC299_2: C299.2 R344.1 | length 35.4
  Top Layer w10: C299.2@2416.41,-99.35 2416.56,-99.5 2451.58,-99.5 R344.1@2451.73,-99.65
NetC300_1: C300.1 J42.2 L27.2 R211.1 | length 772.5
  Top Layer w15: C300.1@2455.89,281.15 2457.14,279.9 2473.21,279.9
  Top Layer w20: 2473.21,279.9 2481.11,287.8 2481.11,379.85 2495.92,394.66 2745.74,394.66 2866.7,273.7 R211.1@2969.9,273.7 2959.9,263.7 2943.29,263.7 J42.2@2889.81,210.22
NetC301_1: C301.1 J42.1 L19.2 R210.1 | length 1341.3
  Top Layer w15: C301.1@2456.59,246.45 2519.31,246.45 L19.2@2550.21,277.35
  Top Layer w20: C301.1@2456.59,246.45 2443.03,232.89 2443.03,228.85 2434.63,220.45 2386.93,220.45 2375.21,232.16 2375.21,311.85 2486.91,423.55 2512.94,423.55 2517.69,428.3 v1(2769.34,428.3) ; J42.1@2889.81,131.48 2890.22,131.89 2970.29,131.89 R210.1@2970.7,132.3
  Layer 4 w20: v1(2769.34,428.3) 2850.9,428.3 2864.4,414.8 2871.63,414.8 2874.91,411.52 2954.61,411.52 2966.33,399.8 2966.33,274.93 2947,255.6 2947,148.64 2930.25,131.89 2890.22,131.89 J42.1@2889.81,131.48
NetC302_1: C302.1 U42.2 | length 176.3
  Top Layer w10: C302.1@2349.11,71.45 2355.91,64.65 2372.55,64.65 2381.81,55.39 2381.81,21.62 2404.68,-1.26 2421.94,-1.26 2445.91,-25.23 U42.2@2445.91,-44.91
NetC303_1: C303.1 C304.1 C305.1 C306.1 C307.1 R347.2 R348.2 U46.6 | length 714.1
  Bottom Layer w15: C303.1@2536.71,124.15 2630.73,124.15 2653.41,146.83 U46.6@2653.41,166.51
  Bottom Layer w20: C307.1@2435.81,292.77 2451.75,276.83 2451.75,273.11 2475.61,249.25 2522.28,249.25 C305.1@2536.71,234.82 ; C306.1@2474.55,-68.45 2487.38,-55.62 2487.38,-33.96 2536.71,15.37 C304.1@2536.71,29.15 2536.71,124.15 C305.1@2536.71,234.82 ; R348.2@2545.01,343.65 2536.71,335.35 C305.1@2536.71,234.82
NetC308_2: C308.2 R349.1 | length 35
  Bottom Layer w20: C308.2@2534.11,-83.65 2534.29,-83.83 2568.83,-83.83 R349.1@2569.01,-84.01
NetC309_2: C309.2 R350.1 | length 35.2
  Bottom Layer w20: R350.1@2692.27,-94.65 2692.67,-94.25 2726.71,-94.25 C309.2@2727.11,-93.85
NetC310_1: C310.1 J43.2 L29.2 R213.1 | length 359.1
  Top Layer w20: v1(2822,383.8) 2885.37,447.17 J43.2@2889.68,447.17
  Bottom Layer w15: L29.2@2668.71,300.75 2696.11,300.75 C310.1@2713.71,283.15
  Bottom Layer w20: L29.2@2668.71,300.75 2668.71,343.75 2686.23,361.26 2799.46,361.26 v1(2822,383.8)
NetC311_1: C311.1 J43.1 L28.2 R212.1 | length 507.2
  Top Layer w20: J43.1@2889.68,368.43 2928.98,407.73 2961.6,407.73 R212.1@2971.6,417.73
  Bottom Layer w15: L28.2@2609.11,300.75 2636.36,273.5 2670.82,273.5 2684.47,259.85 2697.71,259.85 C311.1@2712.81,244.75
  Bottom Layer w20: C311.1@2712.81,244.75 2726.37,231.19 2726.37,227.15 2736.57,216.95 2779.98,216.95 2791.7,228.66 2791.7,270.45 J43.1@2889.68,368.43
NetC312_1: C312.1 U46.2 | length 175.8
  Bottom Layer w15: U46.2@2703.41,-38.21 2703.41,-18.73 2723.67,1.53 2744.26,1.53 2767.36,24.63 2767.36,73.96 v1(2785.1,91.7)
NetD15_1: D15.1 J12.1 R129.2 | length 150.1
  Bottom Layer w20: R129.2@-163.9,2812.2 -160.8,2809.1 -109.33,2809.1 D15.1@-106.23,2806 ; D15.1@-106.23,2809.94 -69.53,2846.64 J12.1@-69.53,2880 -69.53,2883.13 J12.1@-70.6,2884.2
NetD49_1: D49.1 R354.1 | length 151.8
  Bottom Layer w12: D49.1@1646.77,3678.04 1629.15,3660.42 1629.15,3641.9 1628.9,3641.64 1628.9,3583.04 1643.98,3567.96 R354.1@1672.1,3567.96
NetD79_2: D79.2 J11.4 Q3.2 | length 58.6
  Top Layer w20: v1(2626.91,841.28) 2657.77,841.28 Q3.2@2677.41,860.92
NetD80_2: D80.2 J11.3 Q4.2 | length 117.3
  Top Layer w20: Q4.2@2697.51,588.22 2705.51,580.22 2705.51,558.22 v1(2709.71,554.02)
  Bottom Layer w20: J11.3@2650.47,583.1 2650.47,571.58 2668.03,554.02 v1(2709.71,554.02)
NetF1_1: F1.1 J5.4 | length 159
  Top Layer w20: J5.4@-441.65,2808.8 -405.79,2808.8 -393.66,2820.93 F1.1@-287.7,2820.93
NetH2_3: H2.3 R35.2 | length 142.8
  Bottom Layer w6.16: v1(2688.7,1302.3) 2691,1300 2797.92,1300 R35.2@2821.02,1323.1
NetH2_4: H2.4 R40.1 | length 515
  Top Layer w6.16: v1(2523,1342.9) 2523,1317.18 2537.88,1302.3 H2.4@2557.5,1302.3
  Bottom Layer w6.16: R40.1@2311.1,1029.72 2329.98,1048.6 2329.98,1097.42 2329.8,1097.6 2329.8,1230.8 2338.3,1239.3 2357.7,1239.3 2365.3,1246.9 2410.6,1246.9 2505.69,1341.99 2522.09,1341.99 v1(2523,1342.9)
NetH2_5: H2.5 R110.2 | length 138.5
  Bottom Layer w6.16: v1@2689.6,1377.2 2690.58,1377.2 2705.08,1391.7 R110.2@2821.02,1391.7
  Bottom Layer w12: v1(2691.6,1380.7) v1@2692.35,1379.95
NetH2_6: H2.6 R111.1 | length 262.2
  Top Layer w6.16: v1(2444,1248.4) 2467.4,1248.4 2489,1226.8 R111.1@2489,1201.28
  Bottom Layer w6.16: v1(2444,1248.4) 2489.26,1293.66 2495.19,1293.66 2554.2,1352.67 v1(2554.2,1382)
NetH2_7: H2.7 R193.2 | length 137
  Bottom Layer w6.16: v1(2682.6,1461.5) 2819.3,1461.5 R193.2@2819.5,1461.7
NetH2_8: H2.8 R194.1 | length 148
  Top Layer w6.16: R194.1@2497,1332.68 2497,1424.66 2531.64,1459.3 H2.8@2538.7,1459.3
NetH3_1: H3.1 R195.2 | length 111.2
  Top Layer w6.16: v1(2686.2,947.38) 2686.2,909.06 H3.1@2686.5,908.76
  Bottom Layer w12: v1(2686.2,947.38) 2714.99,947.38 2718.27,944.09 2754.31,944.09 R195.2@2756.42,946.2
NetH3_2: H3.2 R196.1 | length 78.8
  Top Layer w6.16: R196.1@2481.7,908.8 2560.47,908.8 H3.2@2560.51,908.76
NetH3_3: H3.3 R197.2 | length 97.2
  Top Layer w6.16: H3.3@2686.5,987.5 2686.5,1011.9 v1@2688.2,1013.6
  Bottom Layer w12: v1(2687.1,1019.3) 2687.35,1019.55 2757.07,1019.55 R197.2@2757.32,1019.8
NetH3_4: H3.4 R198.1 | length 84.1
  Top Layer w6.16: R198.1@2479.88,984.4 2558.3,984.4 H3.4@2562.3,988.4
NetH3_5: H3.5 R199.2 | length 102.7
  Top Layer w6.16: H3.5@2686.5,1066.24 2687.2,1066.94 v1(2687.2,1097.13)
  Bottom Layer w12: v1(2687.2,1097.13) 2715.9,1097.13 2719.27,1100.5 2756.92,1100.5 R199.2@2757.22,1100.2
NetJ5_1: J5.1 J5.5 L1.1 | length 637.3
  Bottom Layer w12: J5.5@-727.15,3176.9 -754.7,3176.9 -837.4,3094.2 -837.4,2813.6 -817.3,2793.5 -729.55,2793.5 J5.1@-727.15,2791.1 -725.35,2792.9 -637.84,2792.9 L1.1@-636.04,2794.7
NetJ7_11: J7.11 R64.1 | length 89.8
  Bottom Layer w12: R64.1@-790.7,433.8 -790.07,433.17 -702.06,433.17 -701.42,432.53
NetJ7_13: J7.13 R66.1 | length 105.4
  Bottom Layer w12: J7.13@-692.2,44.7 -692.2,37.9 -662.2,7.9 R66.1@-608.1,7.9 R66.1@-609.58,9.38
NetJ8_1: J8.1 J8.2 J8.3 J8.4 J8.@574.96,3499.08 J8.@894.64,3499.08 L12.1 | length 889.3
  Layer 4 w6.16: J8.4@567.5,3476.2 571.48,3480.18 J8.1@904.88,3480.18
  Bottom Layer w6.16: J8.4@564.72,3480.18 J8.3@564.72,3659.32 707.32,3659.32 710.93,3662.93 710.93,3670.63 723.25,3682.95 730.95,3682.95 739.3,3691.3 802.4,3691.3 834.38,3659.32 J8.2@904.88,3659.32
NetJ9_19: J9.19 J9.20 J9.21 J9.22 L11.1 | length 1118.4
  Top Layer w12: J9.20@1055.52,3205.03 J9.19@1055.52,3428.63 1224.97,3428.63 1259.9,3393.7 v1(1290.7,3393.7) ; J9.21@1572.92,3205.03 J9.22@1572.92,3428.63
  Bottom Layer w6.16: J9.22@1572.92,3428.63 1591.75,3409.8 1591.75,3329.5 L11.1@1604.42,3316.83
  Bottom Layer w12: v1(1290.7,3393.7) 1399.49,3393.7 1434.41,3428.63 J9.22@1572.92,3428.63
NetJ11_2: J11.2 R327.1 | length 4.5
  Top Layer w20: v1(2773.02,557.37) 2775.57,554.82 R327.1@2776.43,554.82
NetJ13_52: J13.52 R144.1 | length 67.5
  Bottom Layer w6.16: J13.52@936.45,542.93 994.03,542.93 R144.1@1001.01,535.95
NetJ13_53: J13.53 R145.2 | length 81.1
  Bottom Layer w6.16: R145.2@564.97,549.65 581.53,533.09 J13.53@639.2,533.09
NetJ13_55: J13.55 R147.2 R148.2 | length 109.6
  Bottom Layer w6.16: R147.2@564.97,480.75 R148.2@564.97,515.35 566.92,513.4 J13.55@639.2,513.4
NetJ13_56: J13.56 R146.1 | length 65.3
  Bottom Layer w6.16: J13.56@936.45,503.56 998.9,503.56 R146.1@1000.91,501.55
NetJ16_G1: J16.G1 J16.G2 J16.G3 J16.G4 R156.1 | length 1435.9
  Top Layer w6.16: J16.G1@2658.6,2942 2669.5,2931.1 2669.5,2861.5 2654.3,2846.31 2654.3,2807.7 2661.9,2800.1 2828.3,2800.1 2925.41,2897.21 J16.G3@2925.41,3070.84 ; J16.G1@2665.3,2954.81 J16.G1@2674.2,2945.91
  Bottom Layer w6.16: R156.1@2618.7,3357.11 2635.3,3340.51 J16.G2@2663.3,3340.51 ; J16.G1@2669.5,2948.79 J16.G2@2669.5,3322.81 2669.5,3324.11 J16.G2@2673.5,3328.11 ; J16.G3@2925.41,3070.84 2925.41,3421.02 J16.G4@2930.7,3426.31
NetJ17_G1: J17.G1 J17.G2 J17.G3 J17.G4 R177.1 | length 1516.6
  Top Layer w6.16: J17.G1@1986,2947.29 2006.15,2927.14 2090.91,2927.14 2200.76,3036.99 2219.29,3036.99 2241.91,3059.6 J17.G3@2241.91,3069.34 ; J17.G2@1986,3321.31 1986,3345.53 2062.98,3422.51 2104.08,3422.51 2170.6,3489.03 v1(2170.86,3489.03)
  Bottom Layer w6.16: R177.1@1929.99,2910.34 1963.38,2910.34 1986,2932.95 J17.G1@1986,2947.29 J17.G2@1986,3321.31 ; v1(2170.86,3489.03) 2186.42,3489.03 2206.97,3468.48 2219.29,3468.48 2241.91,3445.86 J17.G4@2241.91,3423.68 J17.G3@2241.91,3069.34
NetJ19_10: J19.10 R236.1 | length 75.1
  Bottom Layer w12: J19.10@-58.2,1830.09 -58.11,1830.19 15.41,1830.19 R236.1@16.42,1831.2
NetJ19_38: J19.38 R237.1 | length 75.3
  Bottom Layer w12: J19.38@-58.2,1554.5 -33.78,1554.5 -32.38,1553.1 R237.1@16.54,1553.1
NetJ20_B11: J20.B11 R247.2 | length 292.7
  Bottom Layer w6.16: J20.B11@-720.5,2247.5 -694,2274 -592.6,2274 -531.1,2212.5 R247.2@-464.28,2212.5
NetJ20_B12: J20.B12 R248.2 | length 371
  Bottom Layer w6.16: J20.B12@-809.8,2124.3 -808.29,2125.82 -638.49,2125.82 -607,2157.3 -495.18,2157.3 R248.2@-464.98,2127.1
NetJ20_B17: J20.B17 J20.B31 R137.2 R328.2 | length 872.8
  Top Layer w6.16: v1(-766.3,1767.8) -766.3,1886.74 J20.B17@-722.9,1930.14
  Bottom Layer w6.16: v1(-766.3,1767.8) -766.3,1436.2 -759.6,1429.5 -759.6,1415.66 J20.B31@-722.9,1378.96 ; J20.B17@-723.4,1932 -715.21,1923.81 -692.01,1923.81 -663.2,1895 -603.2,1895 -574.9,1923.3 v1(-464.78,1923.3)
NetL7_1: L7.1 U3.30 | length 116.2
  Top Layer w10: U3.30@281.32,522.98 281.32,547.04
  Top Layer w12: 281.32,547.04 291.36,557.08 334.66,557.08 350.66,573.08 L7.1@350.66,585.08
NetL19_1: L19.1 U42.5 | length 56.3
  Top Layer w15: U42.5@2545.91,159.81 2546.05,159.95 2546.05,210.19 L19.1@2550.21,214.35
NetL27_1: L27.1 U42.8 | length 140.4
  Top Layer w15: U42.8@2395.91,159.81 2396.15,160.05 2396.15,179.74 2415.36,198.95 2446.01,198.95 2462.71,215.65 L27.1@2501.61,215.65
NetL28_1: L28.1 U46.5 | length 73.6
  Bottom Layer w15: U46.5@2603.41,166.51 2603.55,166.65 2603.55,232.19 L28.1@2609.11,237.75
NetL29_1: L29.1 U46.8 | length 135.5
  Bottom Layer w15: L29.1@2658.81,237.75 2681.81,214.75 2704.1,214.75 2732.51,186.34 2753.06,186.34 2753.41,185.99 U46.8@2753.41,166.51
NetLED1_1: LED1.1 R11.2 | length 1.4
  Top Layer w6.16: v1(1858.6,-64.8) 1859.4,-64 LED1.1@1859.7,-64
NetLED2_1: LED2.1 R128.2
  other v1: 1919.12,-119.98
NetLED2_2: LED2.2 Q35.3 | length 93.7
  Top Layer w6.16: LED2.2@1918.32,-62.6 1932.82,-48.1 Q35.3@2006.02,-48.1
NetQ1_1: Q1.1 Q2.3 R132.2 | length 34.8
  Top Layer w20: Q2.3@-121.2,3063.9 -121.2,3076.78 R132.2@-105.68,3092.3
  other v1: -122,3044.1
NetQ1_2: Q1.2 R127.2 R131.2 R132.1 | length 116.3
  Top Layer w20: R132.1@-66.32,3092.3 -64.52,3090.5 -64.52,3073.32 -48.8,3057.6 -48.8,3052.1 -45.3,3048.6 R131.2@-39.8,3048.6
  Bottom Layer w20: Q1.2@-41.3,3043.5 -40.95,3043.15 15.65,3043.15 R127.2@16.6,3042.2
  other v1: -36.3,3042.1
NetQ1_3: Q1.3 R129.1 | length 117.1
  Bottom Layer w20: R129.1@-166,2888 -151.8,2902.2 -139.4,2902.2 -84.5,2957.1 Q1.3@-84.5,2964.1
NetQ2_1: Q2.1 R133.2 R135.1 | length 31.4
  Bottom Layer w6.16: R135.1@-191.8,2972.92 -189.58,2970.7 R133.2@-161.3,2970.7
  other v1: -161.3,2970.8
NetQ3_3: Q3.3 R122.1 R123.1 | length 79.6
  Top Layer w20: Q3.3@2714.91,780.92 2713.36,779.37 2713.36,738.55 R123.1@2711.81,737 2711.91,736.9 2746.01,736.9 R122.1@2746.11,736.8
NetQ4_3: Q4.3 R124.1 R325.1 | length 125.4
  Top Layer w20: R124.1@2576.71,688.42 2576.9,688.23 2576.9,655.01 R325.1@2577.09,654.82 2652.01,654.82 2660.01,662.82 Q4.3@2660.01,668.22
NetQ5_1: Q5.1 Q32.3 R319.2 | length 88.1
  Top Layer w12: v1(-289.12,1101.85) -284.32,1097.05 Q5.1@-284.32,1015.7
NetQ8_1: Q8.1 Q9.3 R158.2 | length 216.5
  Bottom Layer w6.16: R158.2@2632.62,3569.11 2658.1,3594.59 2658.78,3594.59 2673.7,3609.51 Q9.3@2673.7,3616.51 2674.8,3617.61 2738.7,3617.61 2756.2,3635.11 Q8.1@2756.2,3696.61
NetQ9_1: Q9.1 R159.1 R160.1 | length 912.7
  Layer 4 w4.29: v1(2592.1,3694.4) 2584.7,3694.4 2560,3669.7 2560,3486 2584.7,3461.3 2584.7,3336.3 2612.81,3308.19 2632.2,3288.8 2632.2,2923.46 v1(2595.39,2886.65)
  Bottom Layer w4.29: R159.1@2592.6,2885.12 2594.13,2886.65 v1(2595.39,2886.65)
  Bottom Layer w6.16: R160.1@2594,3695.31 Q9.1@2632.7,3695.31
NetQ10_1: Q10.1 Q11.1 Q12.1 Q13.1 R169.2 R171.1 | length 687.7
  Bottom Layer w6.16: Q13.1@2415.8,3027.21 2450.8,3027.21 2452.2,3028.61 ; Q10.1@2416,2906.51 2421.53,2912.04 2439.63,2912.04 ; Q11.1@2416.1,3268.91 2442.4,3268.91 2447.2,3264.11 2447.91,3264.11 2452.2,3259.82 2452.2,3155.21 ; Q12.1@2416.6,3148.11 2445.1,3148.11 2452.2,3155.21 ; R171.1@2553.42,3002.21 2553.42,2968.01 R169.2@2552.92,2967.51 2552.92,2929.53 2535.43,2912.04 2439.63,2912.04 ; 2439.63,2912.04 2452.2,2924.61 2452.2,3028.61 ; 2452.2,3028.61 2452.2,3155.21
NetQ10_3: Q10.3 R161.2 R162.2 | length 168.1
  Bottom Layer w6.16: Q10.3@2496,2944.01 2496,3009.81 2522.17,3035.99 R161.2@2553.02,3035.99 R162.2@2553.02,3070.39
NetQ11_3: Q11.3 R163.2 R164.2 | length 103.6
  Bottom Layer w6.16: Q11.3@2496.1,3306.41 2508.29,3294.22 2535.59,3294.22 R164.2@2553.02,3276.79 R163.2@2553.02,3242.39
NetQ12_3: Q12.3 R165.2 R166.2 | length 95.8
  Bottom Layer w6.16: Q12.3@2496.6,3185.61 2540.99,3185.61 R165.2@2553.02,3173.59 R166.2@2553.02,3207.99
NetQ13_3: Q13.3 R167.2 R168.2 | length 108.2
  Bottom Layer w6.16: Q13.3@2495.8,3064.71 2502.8,3064.71 2534.15,3096.07 2544.3,3096.07 R167.2@2553.02,3104.79 R168.2@2553.02,3139.19
NetQ17_1: Q17.1 Q18.3 R179.2 | length 185.4
  Bottom Layer w12: R179.2@1957.94,3561.94 1957.94,3610.3 Q18.3@1957.7,3610.54 1957.7,3617.54 1969.7,3629.54 2005.6,3629.54 2036.6,3660.54 2036.6,3685.44 Q17.1@2042.3,3691.14
NetQ18_1: Q18.1 R180.1 R181.1 | length 741.9
  Bottom Layer w4.29: R181.1@1875.6,3673.32 1841.3,3639.02 1841.3,3633.76 1825.75,3618.22 1825.75,3508.89 1830.21,3504.44 1830.21,3380.94 1912.51,3298.64 1939.88,3298.64 1944.72,3293.8 1944.72,3200.61 1965,3180.33 R180.1@1965,3077.48
  Bottom Layer w12: R181.1@1875.6,3673.32 1880.82,3678.54 1908.2,3678.54 Q18.1@1920.2,3690.54
NetQ19_1: Q19.1 Q20.1 Q21.1 Q22.1 R190.2 R192.1 | length 669.2
  Bottom Layer w4.29: Q22.1@1746.4,3049.08 1775.46,3049.08 1778.6,3045.94 ; Q21.1@1746.4,3167.11 1772.63,3167.11 1778.6,3161.14 ; Q20.1@1746.4,3285.14 1748.2,3283.34 1776.08,3283.34 1778.6,3280.83 1778.6,3161.14 ; R190.2@1887.42,3001.84 1887.42,2968.04 1887.22,2967.84 1887.22,2948.06 1867.6,2928.44 1749,2928.44 Q19.1@1746.4,2931.04 1778.6,2963.24 1778.6,3045.94 ; 1778.6,3045.94 1778.6,3161.14
NetQ19_3: Q19.3 R182.2 R183.2 | length 141.4
  Bottom Layer w4.29: Q19.3@1826.4,2968.54 1833.4,2968.54 1849.25,2984.4 1849.25,3016.2 1869,3035.94 R182.2@1886.82,3035.94 R183.2@1886.82,3070.42
NetQ20_3: Q20.3 R184.2 R185.2 | length 121.4
  Bottom Layer w4.29: Q20.3@1826.4,3322.64 1827.22,3321.82 1855.32,3321.82 1884.18,3292.96 1884.18,3279.88 R185.2@1886.82,3277.24 R184.2@1886.82,3242.77
NetQ21_3: Q21.3 R186.2 R187.2 | length 96.4
  Bottom Layer w4.29: Q21.3@1826.4,3204.61 1883.13,3204.61 R187.2@1886.82,3208.3 R186.2@1886.82,3173.83
NetQ22_3: Q22.3 R188.2 R189.2 | length 102.5
  Bottom Layer w4.29: Q22.3@1826.4,3086.58 1868.51,3086.58 R188.2@1886.82,3104.89 R189.2@1886.82,3139.36
NetQ30_1: Q30.1 Q31.3 R255.2 | length 107.7
  Top Layer w20: Q30.1@-358.85,2595.85 v1(-357.5,2594.5) -357.5,2510.7 Q31.3@-356.15,2509.35
  Bottom Layer w20: v1(-357.5,2594.5) -356.05,2595.95 R255.2@-356.05,2613.99
NetQ31_1: Q31.1 R256.2 R257.1 | length 36.4
  Top Layer w20: R256.2@-472.35,2547.25 -472.15,2547.05 -436.35,2547.05 Q31.1@-436.15,2546.85
  other v1: -435.6,2546.8
NetQ32_1: Q32.1 R320.2 R321.1 | length 57.2
  Bottom Layer w12: v1(-213.52,1082.37) R321.1@-212.4,1082.37 ; R321.1@-206.17,1088.6 R321.1@-212.4,1082.37 ; R320.2@-167.48,1088.1 -203.92,1088.1 -209.65,1082.37 R321.1@-212.4,1082.37
NetQ35_1: Q35.1 R334.2 R335.1 | length 37.5
  Bottom Layer w6.16: v1(1977.82,-129.3) 1982.54,-124.58 R334.2@1982.54,-93.8
NetR6_1: R6.1 U1.5
  other v1: -320.7,3413.07
NetR8_1: R8.1 U2.8 | length 133
  Top Layer w6.16: v1(-108.31,2432.09) -108.31,2438.08 -82.52,2463.87 -52.47,2463.87 -47.99,2468.35 -47.99,2511.4 -46.29,2513.1 U2.8@-37.56,2513.1
NetR12_2: R12.2 R13.1 R17.1 U2.11 | length 296.8
  Top Layer w12: v1@117.5,2643.4 117.5,2643.77 122.38,2648.65 122.38,2661.43 R13.1@128.18,2667.23
  Bottom Layer w12: v1(5.01,2444.35) 10.81,2450.15 v1@10.81,2470.79 ; v1(6.71,2470.79) 6.71,2517.29 21.03,2531.61 42.21,2531.61 49.24,2538.64 49.24,2559.82 50.61,2561.19 50.61,2597.61 77.24,2624.24 102.47,2624.24 115.43,2637.2 v1@116.55,2637.2
  other v1: 117.55,2642.7
NetR14_2: R14.2 R18.1 U2.6 | length 218.8
  Top Layer w12: v1(-47.99,2585.29) -47.2,2586.08 -41.04,2586.08 -31.62,2595.51 U2.6@-31.62,2604.18
  Bottom Layer w12: v1(-67.79,2405.63) -45.99,2427.43 -45.99,2461.49 -47.99,2463.49 v1(-47.99,2585.29)
NetR15_2: R15.2 U2.3
  other v1: 28.46,2598.83
NetR38_1: R38.1 U4.6
  other v1: 2240.99,1031.07
NetR39_1: R39.1 U4.7
  other v1: 2274.2,1029.63
NetR43_2: R43.2 U4.21
  other v1: 2197.42,1261.94
NetR53_1: R53.1 U3.39 | length 16
  Bottom Layer w12: R53.1@127.77,550.54 v1(127.77,566.53)
NetR63_2: R63.2 U3.31 | length 43.9
  Top Layer w5.61: U3.31@253.76,550.54 253.76,562.78 259.06,568.09 R63.2@259.06,592.2
NetR65_1: R65.1 U31.5
  other v1: -495.45,3384.9
NetR74_1: R74.1 U3.32 | length 51
  Top Layer w6.16: U3.32@238.01,550.54 238.49,551.02 238.49,568.82 v1(239.23,569.56)
  Bottom Layer w6.16: v1(239.23,569.56) 241.14,571.47 241.14,574.88 R74.1@259.06,592.8
NetR95_1: R95.1 U6.3 | length 51.5
  Bottom Layer w6.16: U6.3@530.6,3106.39 530.6,3059.7 R95.1@534,3056.3
NetR99_1: R99.1 U7.3 | length 54.1
  Bottom Layer w6.16: U7.3@1297.21,3534.63 1305.3,3526.54 R99.1@1305.3,3483.91
NetR121_2: R121.2 U16.26 | length 53.9
  Top Layer w6.16: R121.2@2189.31,620.45 2211.06,642.2 U16.26@2234.23,642.2
NetR139_1: R139.1 R140.1 U17.5 | length 44.2
  Top Layer w12: R139.1@433.4,771.3 R139.1@434.32,772.22 ; U17.5@433.9,807.1 v1(433.9,811.04) U17.5@434.32,810.62
  Top Layer w20: R139.1@434.32,772.22 U17.5@434.32,810.62
NetR221_1: R221.1 R222.1 U25.5 | length 39.9
  Top Layer w20: R222.1@149.8,767.4 150,767.6 150,806.96 v1(150.2,807.16)
NetR225_2: R225.2 U26.3
  other v1: 232.28,2145.93
NetR226_2: R226.2 U26.2
  other v1: 234.08,2117.03
NetR230_2: R230.2 U26.6 | length 64.2
  Top Layer w6.16: U26.6@234.03,2221.2 270.81,2221.2 R230.2@290.18,2240.57
NetR233_1: R233.1 U26.4
  other v1: 235.35,2174.33
NetR234_1: R234.1 U26.10
  other v1: 232.78,2324.63
NetR246_1: R246.1 U27.3
  other v1: 407.69,2112.74
NetR251_1: R251.1 R252.1 U28.5 | length 45.8
  Top Layer w20: v1(-239.28,2120) -239.28,2109.82 -233.38,2103.92 -233.38,2079.2 R251.1@-231.58,2077.4
NetR276_2: R276.2 R277.1 U35.7 | length 111.5
  Top Layer w6.16: U35.7@2407.5,1640.31 2407.5,1670.4 R276.2@2442,1704.9 ; R276.2@2444.2,1705.3 2445.1,1704.4 R277.1@2476.5,1704.4
NetR290_1: R290.1 U18.9 | length 102
  Bottom Layer w6.16: U18.9@2519.02,2249.52 2545.39,2249.52 2560.92,2265.05 2560.92,2270.15 2559.91,2271.17 2559.91,2288.28 2556.3,2291.89 2541.29,2291.89 R290.1@2534.26,2298.92
NetR291_1: R291.1 U18.8 | length 113
  Bottom Layer w6.16: R291.1@2500.66,2299.52 2476.16,2275.02 2476.16,2246.32 2492.64,2229.84 U18.8@2519.02,2229.84
NetR308_1: R308.1 U39.3 | length 48.2
  Bottom Layer w6.16: R308.1@-278.1,3512.3 -278.1,3550 U39.3@-270.7,3557.4
NetR309_1: R309.1 U40.3 | length 50.3
  Bottom Layer w6.16: R309.1@-395.5,3508.8 -395.5,3555.29 U40.3@-392.8,3557.99
NetR317_1: R317.1 R318.1 U43.5 | length 38.9
  Top Layer w12: U43.5@-156.42,610.32 -155.88,610.32 v1(-154.92,611.29)
  Bottom Layer w12: v1(-154.92,611.29) -154.86,611.35 -117.98,611.35 R317.1@-117.92,611.41
NetR323_1: R323.1 U48.3 | length 44.8
  Bottom Layer w12: U48.3@1475.01,3535.53 1479.98,3530.56 R323.1@1479.98,3492.83
NetR343_2: R343.2 U42.4 | length 37.4
  Top Layer w20: U42.4@2545.91,-44.91 2545.91,-49.85 2548.04,-51.97 2574.91,-51.97 R343.2@2576.71,-53.77
NetR344_2: R344.2 U42.3 | length 56.7
  Top Layer w12: R344.2@2491.09,-99.65 2495.19,-95.55 2495.19,-45.63 U42.3@2495.91,-44.91
NetR345_2: R345.2 R346.1 U42.1 | length 127.9
  Top Layer w10: R346.1@2310.5,-32.7 2315.62,-27.58 2324.08,-27.58 R345.2@2348.81,-2.85 ; R345.2@2347.8,-4.1 2373.24,-4.1 2374.01,-3.33 2395.91,-25.23 U42.1@2395.91,-44.91
NetR349_2: R349.2 U46.4 | length 38.5
  Bottom Layer w20: R349.2@2569.01,-44.65 2570.81,-42.85 2601.28,-42.85 2603.41,-40.73 U46.4@2603.41,-38.21
NetR350_2: R350.2 U46.3 | length 56.6
  Bottom Layer w20: R350.2@2652.91,-94.65 2653.16,-94.4 2653.16,-38.46 U46.3@2653.41,-38.21
NetR351_2: R351.2 R352.1 U46.1 | length 212.8
  Top Layer w12: v1(2775.44,-35.22) 2776.23,-36.01 2776.23,-77.73 2786.31,-87.81 2803.66,-87.81 2805.58,-85.88 2813.27,-85.88 2821.7,-77.45 2821.7,-36.38 2820.3,-34.98 2820.3,-30.1 2804.4,-14.2 2804.4,-0.78 R352.1@2798.6,5.02
  Bottom Layer w12: U46.1@2753.41,-38.21 2753.41,-36.95 2755.14,-35.22 v1(2775.44,-35.22)
NetR386_1: R386.1 R387.2 U3.37 | length 89.4
  Top Layer w6.16: R387.2@94.58,592.71 94.96,593.08 R386.1@126.68,593.08 146.1,573.66 147.95,573.66 159.27,562.34 U3.37@159.27,550.54
NetSPK1_1: SPK1.1 SW5.2 | length 875.3
  Bottom Layer w12: SW5.2@520.09,2198.6 535.84,2198.6 579.44,2155 1168.2,2155 SPK1.1@1316.1,2302.9
NetSPK1_2: SPK1.2 SW5.5 | length 213.2
  Bottom Layer w12: SW5.5@744.49,2198.6 810.23,2198.6 SPK1.2@914.53,2302.9
OE: R223.2 U26.8
  other v1: 229.58,2275.53
PCIE20_0_REFCLKN: BTB_3.93
PCIE20_0_REFCLKP: BTB_3.92
PCIE20_0_RXN: BTB_3.98 C297.1 | length 2794
  Top Layer w4.29: v1(486.2,-15.58) 489.41,-15.58 497.58,-23.74 717.32,-23.74 1333.4,-23.75 1338.96,-18.18 1338.96,-6.57 1338.63,-6.24 1338.63,30.4 BTB_3.98@1335.86,33.17
  Layer 4 w4.21: v1(-633.76,916.2) -633.76,919.43 -640.56,926.23 -640.56,929.86 -643.03,932.33 -646.51,932.33 -657.6,921.24 -657.6,874.4 -652,868.8 -650.51,867.31 -643.28,860.08 -639.8,860.08 -637.34,862.54 -634.34,862.54 -622.34,850.55 -622.34,847.55 -626.27,843.62 -626.27,840.62 -614.27,828.62 -611.27,828.62 -607.34,832.55 -604.34,832.55 -592.34,820.55 -592.34,817.55 -594.8,815.09 -594.8,811.6 -578.09,794.89 -578.09,790.41 -578.09,743.09 -569.55,734.55 -568.06,733.06 -541.87,706.87 -538.38,706.87 -535.2,710.04 -532.2,710.04 -520.21,698.05 -520.21,695.05 -525.1,690.15 -525.1,687.15 -513.1,675.15 -510.1,675.15 -505.21,680.05 -502.21,680.05 -490.21,668.05 -490.21,665.05 -493.39,661.87 -493.39,658.39 -478.39,643.39 -476.9,641.9 -467.38,632.38 -348.42,632.38 -271.77,555.72 -119.02,555.72 -57.49,494.19 -57.49,171.54 141.23,-27.18 439.1,-27.18 446.46,-19.81 478.73,-19.81 482.97,-15.58 v1(486.2,-15.58)
PCIE20_0_RXP: BTB_3.97 C298.1 | length 2796.4
  Top Layer w4.29: v1(486.21,-35.26) 487.44,-34.03 713.06,-34.03 1337.66,-34.04 1349.25,-22.45 1349.25,-7.57 1355.54,-1.28 BTB_3.97@1355.54,33.17
  Layer 4 w4.21: v1(-633.76,961.4) -633.76,958.17 -640.56,951.37 -640.56,947.74 -643.03,945.27 -651.87,945.27 -670.54,926.6 -670.54,869.04 -589.3,787.8 -589.3,735.5 -482.41,628.61 -475.06,621.26 -472.11,621.26 -472.02,621.17 -353.07,621.17 -276.41,544.51 -123.67,544.51 -68.7,489.55 -68.7,166.9 136.59,-38.39 443.74,-38.39 451.1,-31.02 478.75,-31.02 482.99,-35.26 v1(486.21,-35.26)
PCIE20_0_TXN: BTB_3.95 C296.1 | length 2849.2
  Top Layer w4.29: v1(486.02,-74.63) 489.23,-74.63 493.5,-70.36 1370.68,-70.36 1390.86,-50.18 1390.86,-17.12 1394.91,-13.07 BTB_3.95@1394.91,33.17
  Layer 4 w4.21: v1(-633.76,801.6) -633.76,798.37 -642,790.13 -642,790.02 -647.37,784.65 -655.5,784.65 -665.51,774.64 -665.51,743.1 -523.44,601.03 -505.4,582.99 -365.49,582.99 -301.28,518.78 -142.73,518.78 -111.61,487.66 -111.61,5.36 -35.86,-70.39 478.56,-70.39 482.8,-74.63 v1(486.02,-74.63)